# Altium PCB PCB1.pcbdoc
Units mil, origin at the board's own origin, x right, y up, seen from the top; angles counter-clockwise.
Board outline 1975 x 2135 mil, 2 copper layers (Top Layer, Bottom Layer); 12 components, 8 nets, 24 pads, 0 vias.
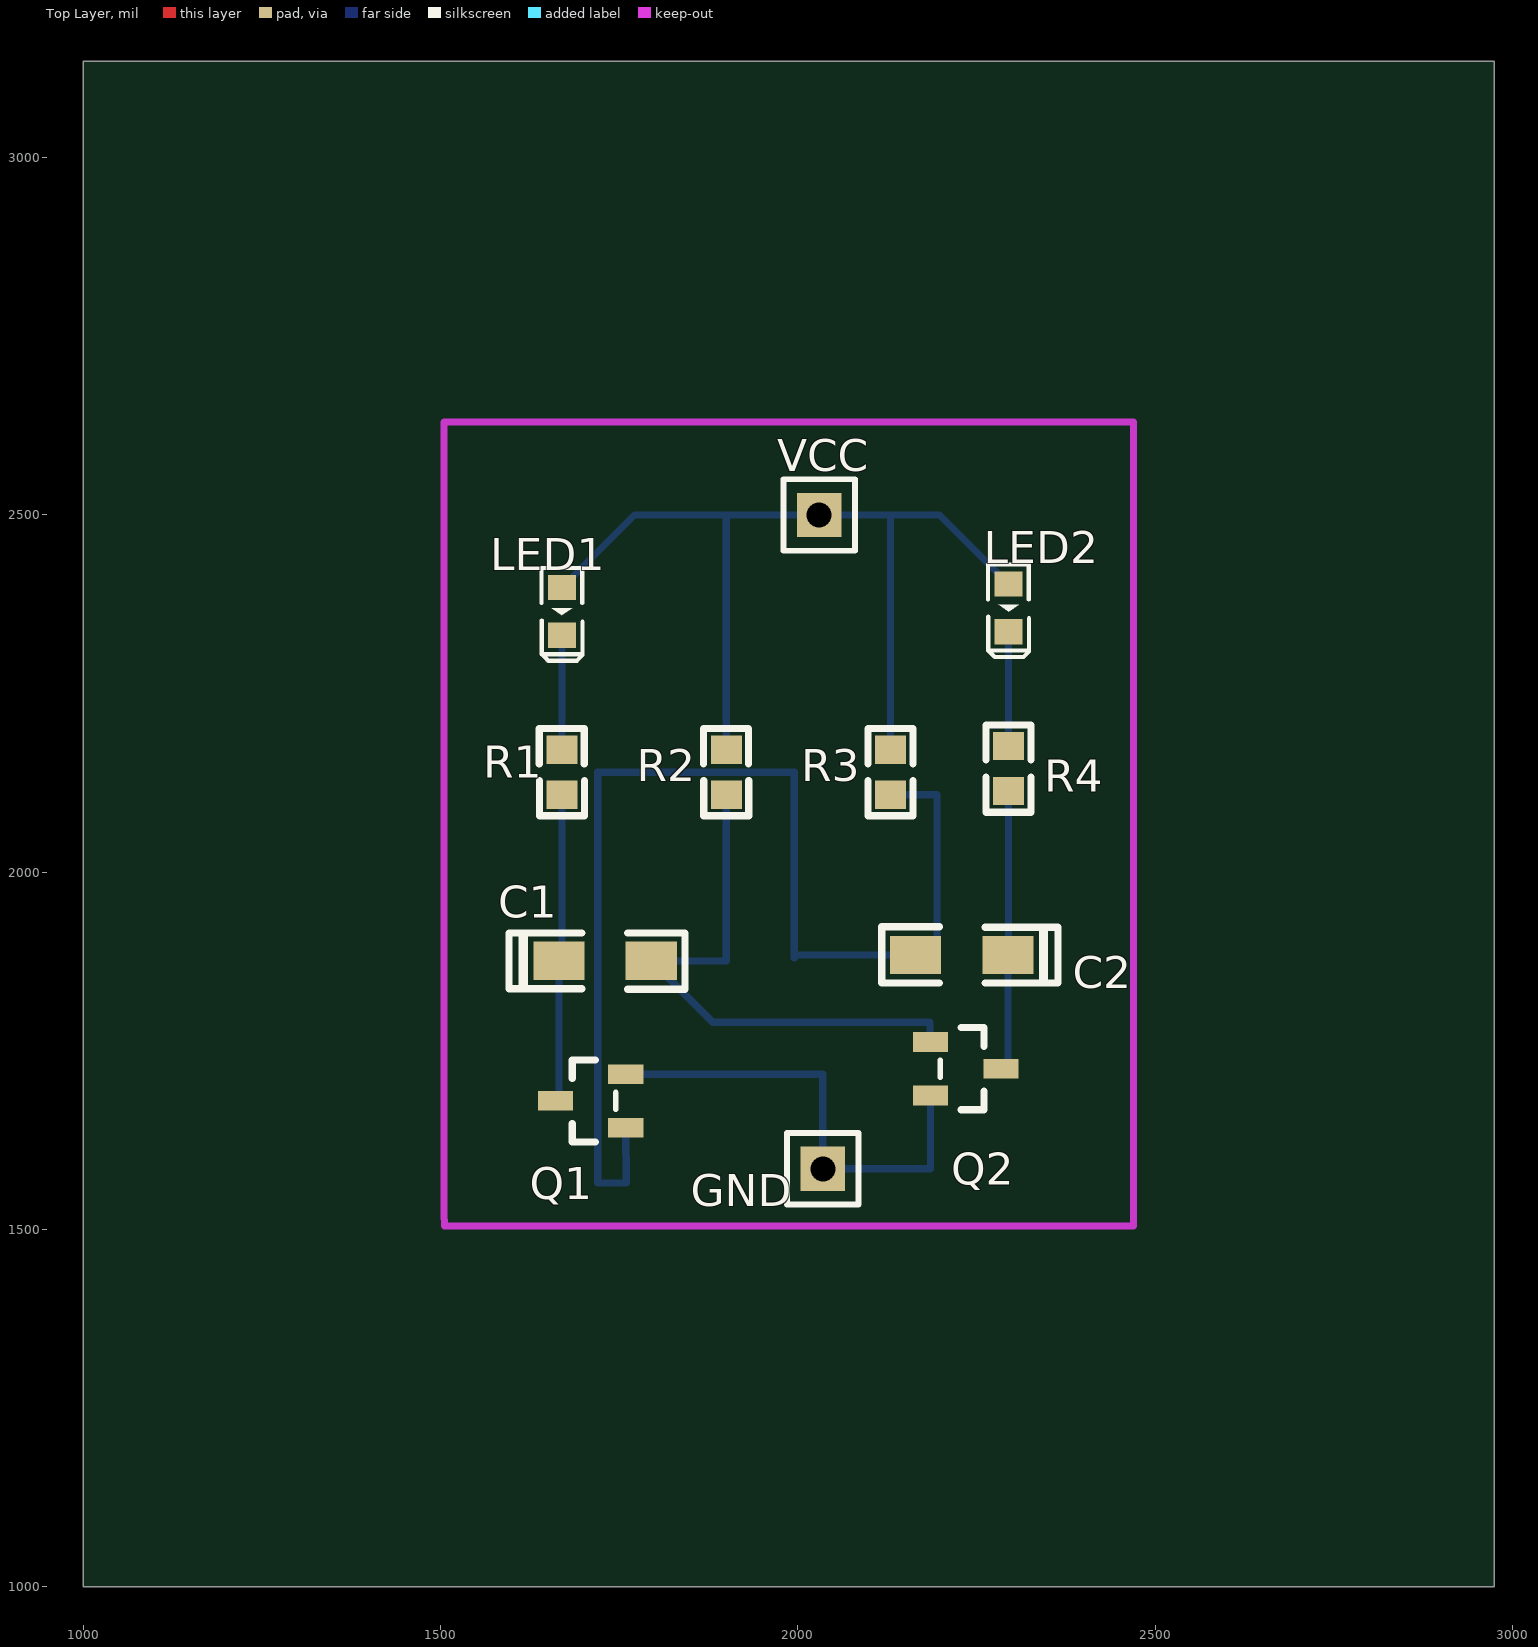
[diagram p0: Top Layer view]
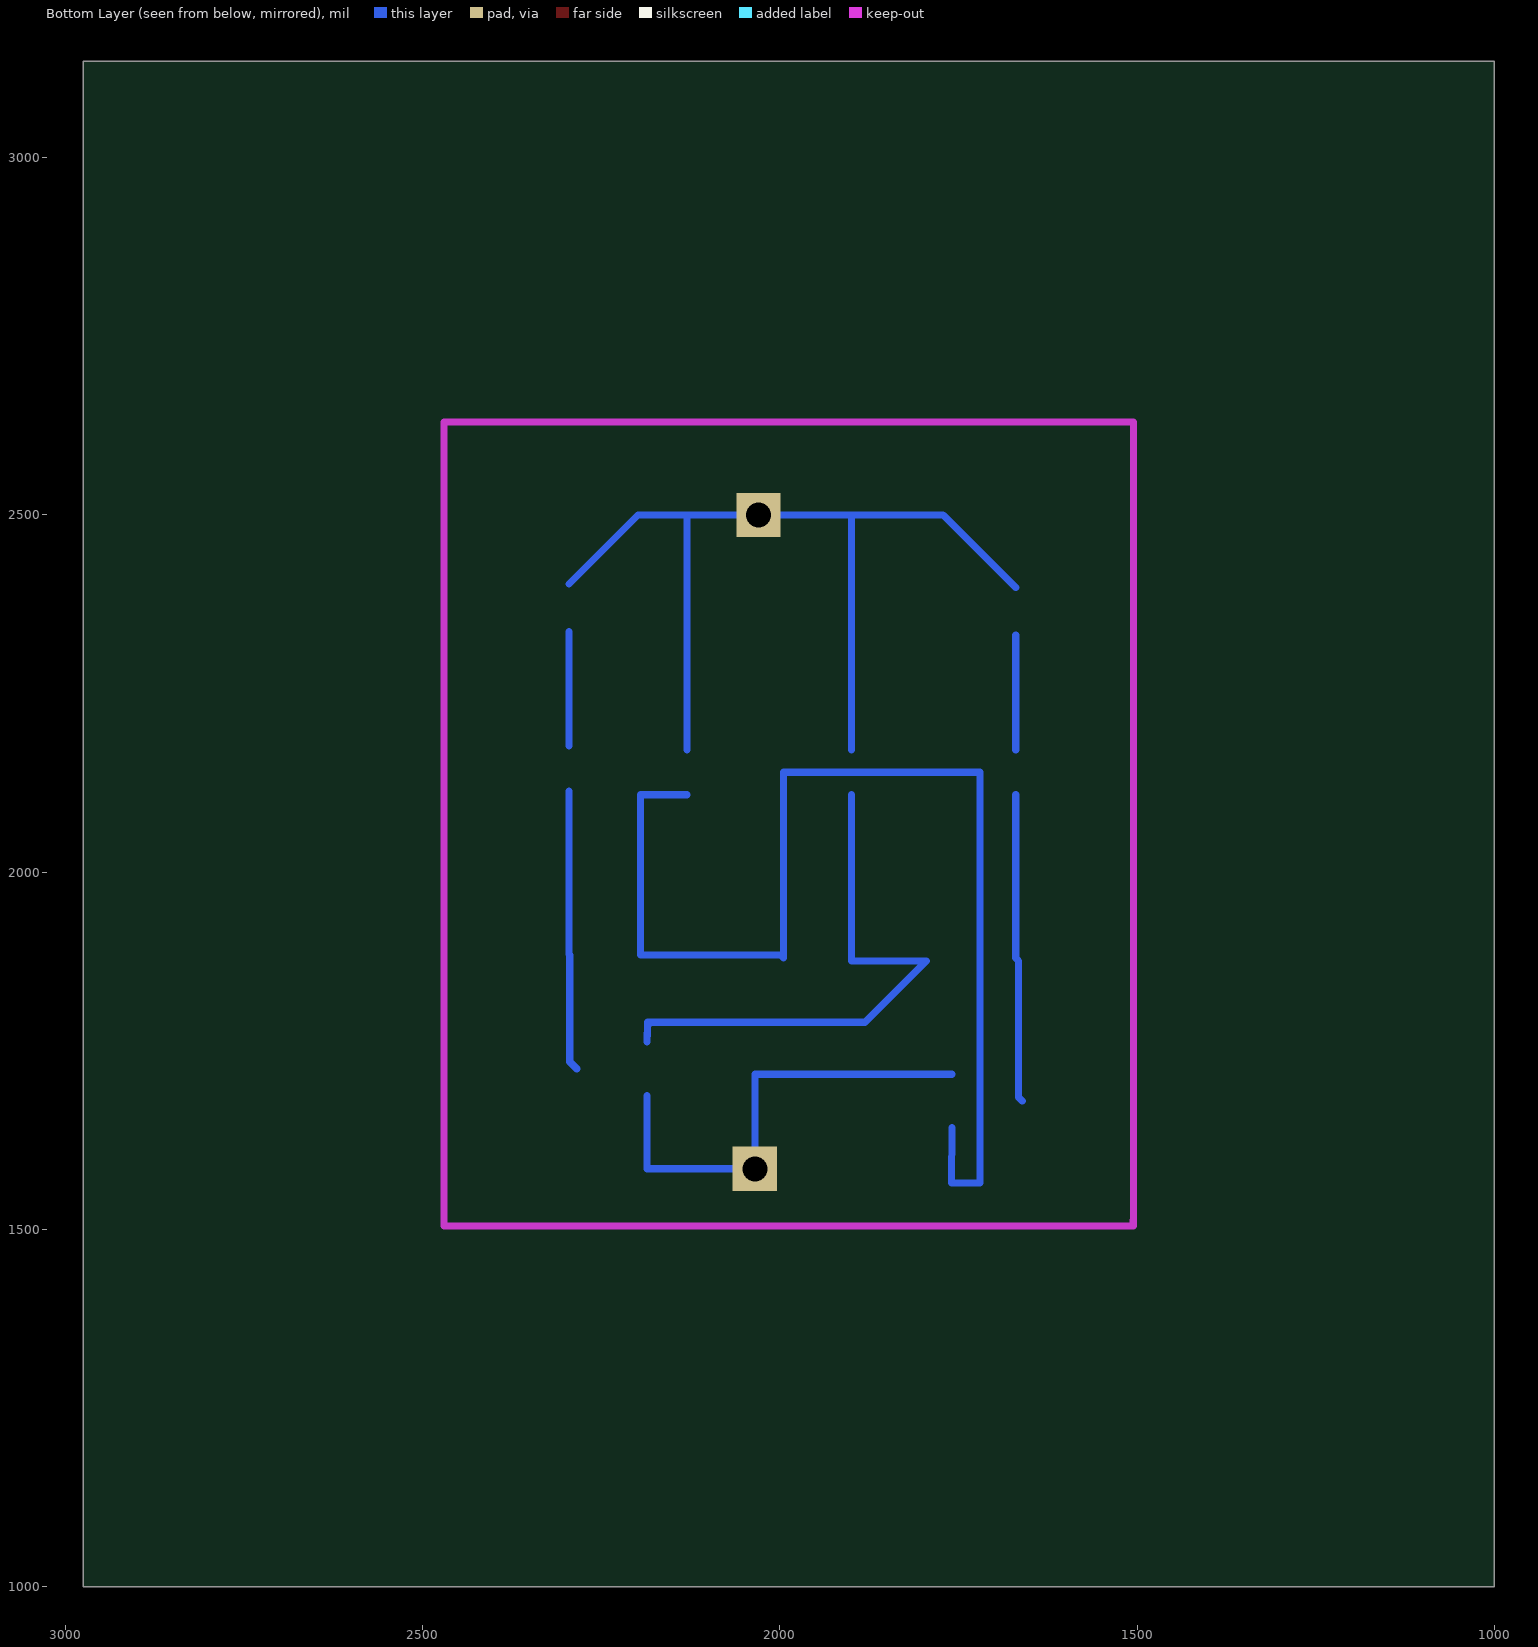
[diagram p1: Bottom Layer view, seen from below]

## Layer stack, top to bottom
Top Solder: solder mask 0.4, Solder Resist, Dk 3.5
Top Layer: signal copper 1.4
Dielectric1: dielectric 12.6, FR-4, Dk 4.8
Bottom Layer: signal copper 1.4
Bottom Solder: solder mask 0.4, Solder Resist, Dk 3.5

## Board outline
2975,1000 1000,1000 1000,3135 2975,3135

## Design rules (kind name [scope] priority, off if disabled: settings)
Clearance [All] p1: gap=10 ignorepadtopadclearanceinfootprint=FALSE
PolygonConnect [All] p1: connectstyle=Relief reliefconductorwidth=10 reliefentries=4 polygonreliefangle="90 Angle" airgapwidth=10
RoutingVias [All] p1: holewidth=28 width=50 viastyle="Through Hole" minholewidth=28 minwidth=50 maxholewidth=28 maxwidth=50
SolderMaskExpansion [All] p1: expansion=0 istentingtop=FALSE
Width [All] p1: maxlimit=10 minlimit=10 preferedwidth=10
30 further rules are at their usual default settings.

## Components (designator, comment, footprint, x,y, rotation, side; value= is the part's Value field where it differs from the comment)
C1 "100uF" CASE-A_3216 1735,1875 r180 top
C2 "100uF" CASE-A_3216 2225,1885 r0 top
GND "GND" HDR-M-2.54_1X1 2035,1585 r0 top
LED1 "LED-0603_R" LED0603_RED 1670,2365 r270 top
LED2 "LED-0603_R" LED0603_RED 2295,2370 r270 top
Q1 "2N3904(SOT-23)" SOT-23-3_L2.9-W1.3-P1.90-LS2.4-TR 1710,1680 r0 top
Q2 "2N3904(SOT-23)" SOT-23-3_L2.9-W1.3-P1.90-LS2.4-TR 2235,1725 r180 top
R1 "470" R0603 1670,2140 r90 top
R2 "10k" R0603 1900,2140 r90 top
R3 "10k" R0603 2130,2140 r90 top
R4 "470" R0603 2295,2145 r90 top
VCC "VCC" HDR-M-2.54_1X1 2030,2500 r0 top

## Footprints (in the part's own frame and the unit in brackets; to place one, negate y for a bottom-side part, rotate by r counter-clockwise, add the part's x,y. Pads: shape width x height; smd on the part's side, far side on the other; paste and mask are expansions set on the pad)
CASE-A_3216 [mil]
  rect 71.5x53.5 smd paste+0 mask+4: 1(69,-1) 2(-60,-1)
  silkscreen extent -107,-40 139,39
HDR-M-2.54_1X1 [mil]
  rect 62x62 hole 35 paste-99999 mask+4: 1(0,0)
  silkscreen extent -50,-50 50,50
LED0603_RED [mm]
  rect 0.9x1 smd paste+0 mask+0.102: 1(-0.85,0) 2(0.85,0)
  silkscreen extent -1.54,-0.73 1.75,0.73
R0603 [mm]
  rect 1x1.1 smd paste+0 mask+0.102: 1(-0.8,0) 2(0.8,0)
  silkscreen extent -1.55,-0.8 1.55,0.81
SOT-23-3_L2.9-W1.3-P1.90-LS2.4-TR [mm]
  rect 1.25x0.7 smd paste+0 mask+0.102: 1(1.25,0.95) 2(1.25,-0.95) 3(-1.25,0)
  silkscreen extent -0.65,-1.46 0.9,1.46

## Nets (pads, with @x,y where several pads share a name; then routed paths per layer and width w, separated by ;. In a path a pad name is that pad's centre, name@x,y a point inside that pad or via, vN(x,y) a via of type N, cw(c..) or ccw(c..) an arc to the next point about the centre after c; other vN are vias at no path point)
Q1_1: GND.1 Q1.1 Q2.1 | length 661.6
  Bottom Layer w10: 1759.2,1717.4 2035,1717.4 GND.1 2185.8,1585 2185.8,1687.6
Q1_2: C2.2 Q1.2 R3.1 | length 1718.8
  Bottom Layer w10: 1759.2,1642.6 1760,1565 1720,1565 1720,2140 1995,2140 1995,1880 1999,1884 2165,1884 2195,1884 2195,2108.5 2130,2108.5
Q1_3: C1.1 Q1.3 R1.1 | length 432.3
  Bottom Layer w10: 1660.8,1680 1666,1685.2 1666,1876 1670,1880 1670,2108.5
Q2_2: C1.2 Q2.2 R2.1 | length 790.7
  Bottom Layer w10: 1900,2108.5 1900,1876 1795,1876 1881,1790 2185,1790 2185.8,1762.4
Q2_3: C2.1 Q2.3 R4.1 | length 393
  Bottom Layer w10: 2284.2,1725 2294,1734.8 2294,1884 2295,1885 2295,2113.5
R1_2: LED1.2 R1.2 | length 160
  Bottom Layer w10: 1670,2171.49 1670,2331.54
R2_2: LED1.1 LED2.1 R2.2 R3.2 VCC.1 | length 1594.1
  Bottom Layer w10: 1670,2398.47 1771.53,2500 VCC.1 ; 1900,2171.49 1900,2500 VCC.1 ; 2130,2171.49 2130,2500 VCC.1 ; 2295,2403.47 2198.47,2500 VCC.1
R4_2: LED2.2 R4.2 | length 160
  Bottom Layer w10: 2295,2176.49 2295,2336.54

## Silkscreen, mask and mechanical layers (free items; w line width, h text height)
Document:
  lines w0.1: 1987.49,2067.49 1987.51,2067.51